# Altium PCB NB3000XN.PcbDoc (part 32 of 71)
Units mil, origin at the board's own origin, x right, y up, seen from the top; angles counter-clockwise.
Board outline 9527.56 x 6929.77 mil, 6 copper layers (Top Layer, GND+SHIELD, MidLayer1, MidLayer2, P2 - 3V3+5V0, Bottom Layer), stack 62.375 mil thick; 832 components, 1027 nets, 4655 pads, 4981 vias.
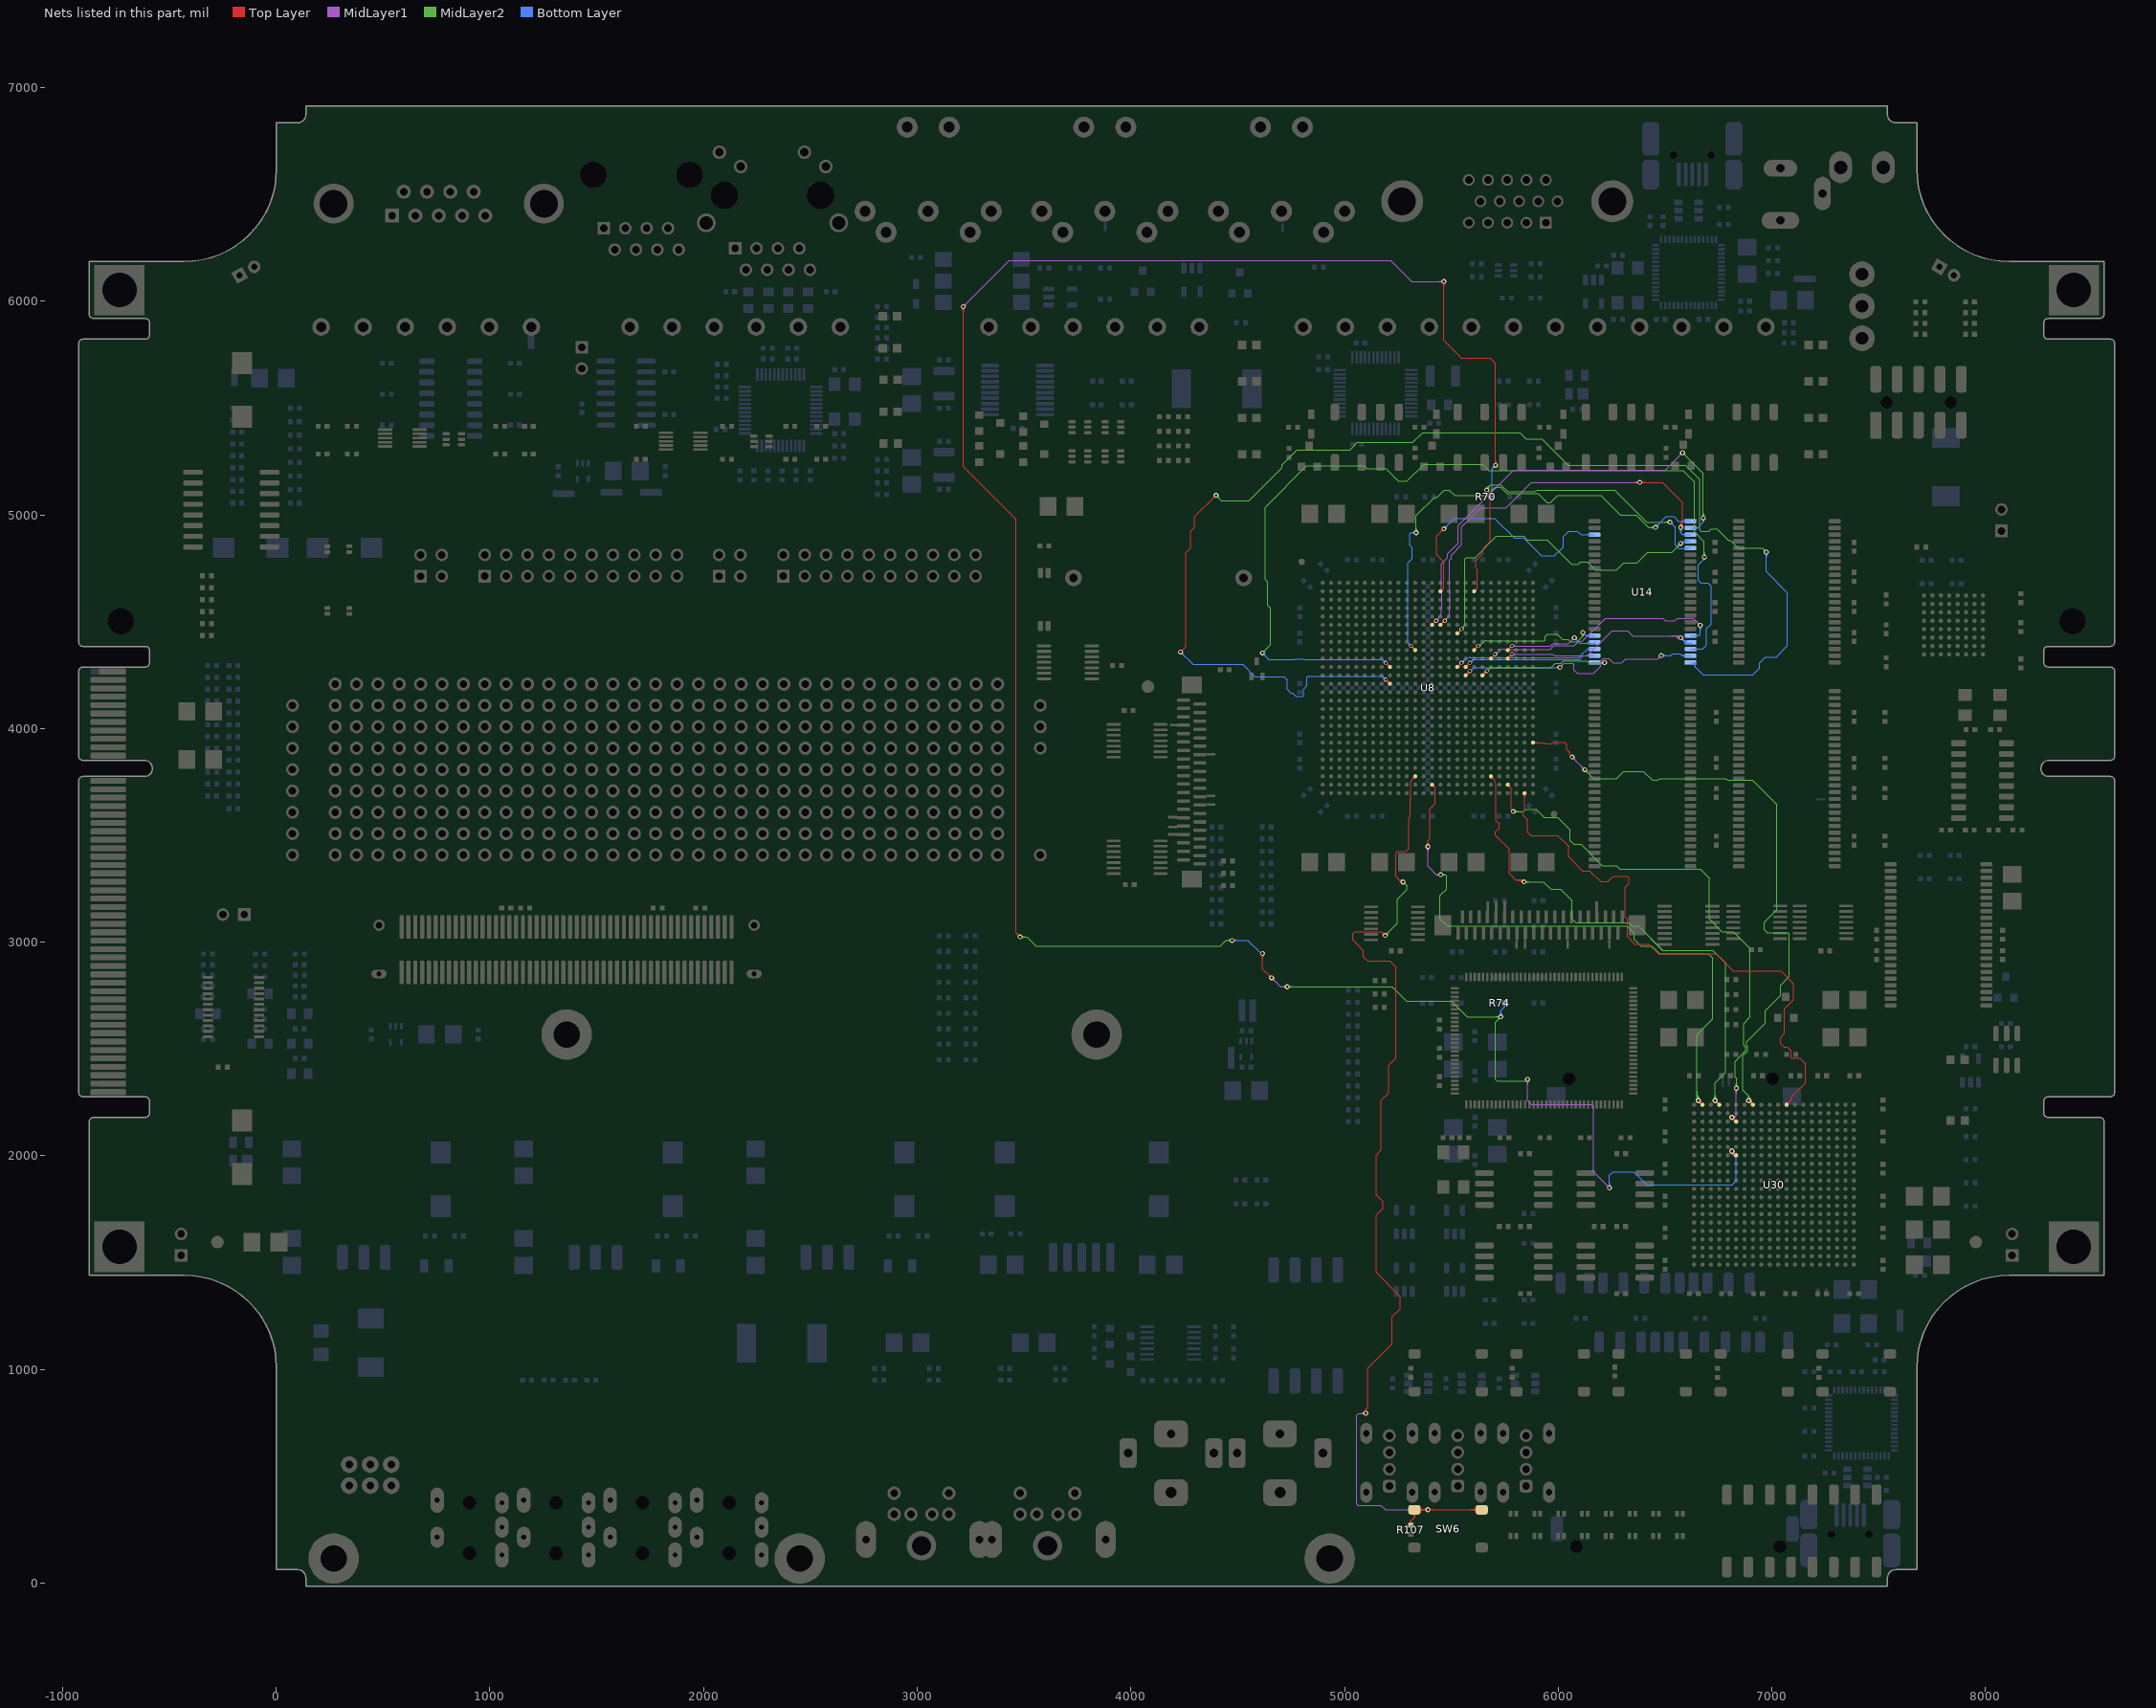
[diagram p36: the nets of this part, all layers, seen from the top]

## Via types
v1: diameter 23, hole 11.81, Top Layer to Bottom Layer, 3672 vias
v2: diameter 26, hole 11.81, Top Layer to Bottom Layer, 461 vias
v3: diameter 19, hole 11.81, Top Layer to Bottom Layer, tented both sides, 396 vias
v4: diameter 23.62, hole 11.81, Top Layer to Bottom Layer, 288 vias
v5: diameter 20, hole 11.81, Top Layer to Bottom Layer, 91 vias
v6: diameter 23, hole 11.81, Top Layer to Bottom Layer, tented both sides, 50 vias
v7: diameter 31, hole 11.81, Top Layer to Bottom Layer, 15 vias
v8: diameter 27.56, hole 11.81, Top Layer to Bottom Layer, tented both sides, 4 vias
v9: diameter 29, hole 11.81, Top Layer to Bottom Layer, 3 vias
v10: diameter 21, hole 11.81, Top Layer to Bottom Layer, 1 vias

## Nets (pads, with @x,y where several pads share a name; then routed paths per layer and width w, separated by ;. In a path a pad name is that pad's centre, name@x,y a point inside that pad or via, vN(x,y) a via of type N, cw(c..) or ccw(c..) an arc to the next point about the centre after c; other vN are vias at no path point) (continued)
DB_PROGRAM.PROGRAM: R70.1 R74.1 U30.R7 | length 12775.2
  Top Layer w4: v1@3208.47,5968.32 cw(c3192.26,5952.11) 3215.19,5952.11 cw(c3238.13,5952.11) v1@3221.91,5968.32 ; v1@3211.3,5971.15 cw(c3201.91,5961.76) 3215.19,5961.76 cw(c3228.47,5961.76) v1@3219.08,5971.15 ; v1(3215.19,5975.04) 3215.19,5224.81 3461.52,4978.48 3461.52,3045.37 v1(3481.86,3025.04) ; v1@3472.36,3025.04 ccw(c3449.42,3025.04) 3465.64,3041.26 ccw(c3481.86,3057.48) v1@3481.86,3034.54 ; v1@3476.36,3025.04 ccw(c3463.08,3025.04) 3472.47,3034.43 ccw(c3481.86,3043.82) v1@3481.86,3030.54 ; v1@4609.81,2940.66 cw(c4593.59,2924.44) 4616.52,2924.44 cw(c4639.46,2924.44) v1@4623.24,2940.66 ; v1@4612.64,2943.49 cw(c4603.25,2934.1) 4616.52,2934.1 cw(c4629.8,2934.1) v1@4620.41,2943.49 ; v1@4615.19,2947.37 v1(4616.52,2947.37) 4616.52,2875.37 v1(4658.52,2833.37) ; v1@4649.02,2833.37 ccw(c4626.09,2833.37) 4642.31,2849.59 ccw(c4658.52,2865.81) v1@4658.52,2842.87 ; v1@4653.02,2833.37 ccw(c4639.75,2833.37) 4649.14,2842.76 ccw(c4658.52,2852.15) v1@4658.52,2838.87 ; v1@5458.47,6085.99 cw(c5442.26,6069.77) 5465.19,6069.77 cw(c5488.13,6069.77) v1@5471.91,6085.99 ; v1@5461.3,6088.82 cw(c5451.91,6079.43) 5465.19,6079.43 cw(c5478.47,6079.43) v1@5469.08,6088.82 ; v1(5465.19,6092.71) 5465.19,5816.71 5548.52,5733.37 5681.86,5733.37 5706.86,5708.37 v1(5706.86,5232.04) ; v1@5700.14,5238.76 ccw(c5683.92,5254.98) 5706.86,5254.98 ccw(c5729.79,5254.98) v1@5713.57,5238.76 ; v1@5702.97,5235.93 ccw(c5693.58,5245.32) 5706.86,5245.32 ccw(c5720.14,5245.32) v1@5710.75,5235.93
  Top Layer w8: v2@6813.15,2013.48 cw(c6813.15,1991.75) 6828.51,2007.12 cw(c6843.88,2022.48) v2@6822.15,2022.48 ; v2(6813.15,2022.48) U30.R7@6832.83,2002.8 ; U30.R7@6826.99,2002.8 ccw(c6812.89,2002.8) 6822.86,2012.77 ccw(c6832.83,2022.74) U30.R7@6832.83,2008.64
  MidLayer1 w4: v1(3215.19,5975.04) 3431.86,6191.71 5215.19,6191.71 5315.19,6091.71 5465.19,6091.71 v1(5465.19,6092.71) ; v1@3215.19,5980.54 ccw(c3215.19,5993.82) 3224.58,5984.43 ccw(c3233.97,5975.04) v1@3220.69,5975.04 ; v1@3215.19,5984.54 ccw(c3215.19,6007.48) 3231.41,5991.26 ccw(c3247.63,5975.04) v1@3224.69,5975.04 ; v1@4658.52,2823.87 cw(c4658.52,2800.94) 4674.74,2817.16 cw(c4690.96,2833.37) v1@4668.02,2833.37 ; v1@4658.52,2827.87 cw(c4658.52,2814.6) 4667.91,2823.99 cw(c4677.3,2833.37) v1@4664.02,2833.37 ; v1(4658.52,2833.37) 4700.19,2791.71 v1(4731.86,2791.71) ; v1@4725.14,2784.99 ccw(c4708.92,2768.77) 4708.92,2791.71 ccw(c4708.92,2814.64) v1@4725.14,2798.43 ; v1@4727.97,2787.82 ccw(c4718.58,2778.43) 4718.58,2791.71 ccw(c4718.58,2804.99) v1@4727.97,2795.6 ; 5439.84,6091.71 ccw(c5439.84,6118.06) v1@5458.47,6099.43 ; 5444.67,6091.71 cw(c5444.67,6072.19) v1@5458.47,6085.99 ; 5449.5,6091.71 ccw(c5449.5,6108.4) v1@5461.3,6096.6 ; v1@5850.14,2351.66 cw(c5833.92,2335.44) 5856.86,2335.44 cw(c5879.79,2335.44) v1@5863.57,2351.66 ; v1@5852.97,2354.49 cw(c5843.58,2345.1) 5856.86,2345.1 cw(c5870.14,2345.1) v1@5860.75,2354.49 ; v1(5856.86,2358.37) 5856.86,2258.37 5873.52,2241.71 6156.86,2241.71 6165.19,2233.37 6165.19,1925.04 v1(6240.19,1850.04) ; v1@6230.69,1850.04 ccw(c6207.76,1850.04) 6223.97,1866.26 ccw(c6240.19,1882.48) v1@6240.19,1859.54 ; v1@6234.69,1850.04 ccw(c6221.41,1850.04) 6230.8,1859.43 ccw(c6240.19,1868.82) v1@6240.19,1855.54
  MidLayer2 w4: v1(3481.86,3025.04) 3515,3025.04 3557.33,2982.71 4419.33,2982.71 4445,3008.37 v1(4473.52,3008.37) ; v1@3485.75,3021.15 cw(c3495.14,3011.76) 3495.14,3025.04 cw(c3495.14,3038.32) v1@3485.75,3028.93 ; v1@3488.57,3018.32 cw(c3504.79,3002.11) 3504.79,3025.04 cw(c3504.79,3047.98) v1@3488.57,3031.76 ; v1@4466.81,3001.66 ccw(c4450.59,2985.44) 4450.59,3008.37 ccw(c4450.59,3031.31) v1@4466.81,3015.09 ; v1@4469.64,3004.49 ccw(c4460.25,2995.1) 4460.25,3008.37 ccw(c4460.25,3021.65) v1@4469.64,3012.26 ; v1(4731.86,2791.71) 5223.52,2791.71 5290.52,2724.71 5500.29,2724.71 5575.29,2649.71 5683.67,2649.71 5685,2651.04 v1(5731.86,2651.04) 5706.86,2626.04 5706.86,2358.14 5715,2350 5848.48,2350 v1(5856.86,2358.37) ; v1@4735.75,2787.82 cw(c4745.14,2778.43) 4745.14,2791.71 cw(c4745.14,2804.99) v1@4735.75,2795.6 ; v1@4738.57,2784.99 cw(c4754.79,2768.77) 4754.79,2791.71 cw(c4754.79,2814.64) v1@4738.57,2798.43 ; v1@5722.36,2651.04 cw(c5699.42,2651.04) 5715.64,2634.82 cw(c5731.86,2618.61) v1@5731.86,2641.54 ; v1@5725.14,2644.32 ccw(c5708.92,2628.11) 5708.92,2651.04 ccw(c5708.92,2673.98) v1@5725.14,2657.76 ; v1@5726.36,2651.04 cw(c5713.08,2651.04) 5722.47,2641.65 cw(c5731.86,2632.26) v1@5731.86,2645.54 ; v1@5727.97,2647.15 ccw(c5718.58,2637.76) 5718.58,2651.04 ccw(c5718.58,2664.32) v1@5727.97,2654.93
  Bottom Layer w4: v1(4473.52,3008.37) 4547.19,3008.37 4608.19,2947.37 v1(4616.52,2947.37) ; v1@4477.41,3004.49 cw(c4486.8,2995.1) 4486.8,3008.37 cw(c4486.8,3021.65) v1@4477.41,3012.26 ; v1@4480.24,3001.66 cw(c4496.46,2985.44) 4496.46,3008.37 cw(c4496.46,3031.31) v1@4480.24,3015.09 ; R70.1@5677.09,5092.08 ccw(c5645.47,5123.7) 5690.19,5123.7 ; R70.1@5679.92,5089.25 ccw(c5655.13,5114.05) 5690.19,5114.05 ; R70.1@5682.75,5086.42 ccw(c5664.78,5104.39) 5690.19,5104.39 ; R70.1@5683.68,5085 5683.68,5083.37 5690.19,5083.37 5690.19,5085 5690.19,5215.37 v1(5706.86,5232.04) ; v1@5697.36,5232.04 cw(c5674.42,5232.04) 5690.64,5215.82 cw(c5706.86,5199.61) v1@5706.86,5222.54 ; v1@5701.36,5232.04 cw(c5688.08,5232.04) 5697.47,5222.65 cw(c5706.86,5213.26) v1@5706.86,5226.54 ; v1@5725.14,2657.76 ccw(c5708.92,2673.98) 5731.86,2673.98 ccw(c5754.79,2673.98) v1@5738.57,2657.76 ; v1@5727.97,2654.93 ccw(c5718.58,2664.32) 5731.86,2664.32 ccw(c5745.14,2664.32) v1@5735.75,2654.93 ; v1(5731.86,2651.04) 5731.86,2680.05 5748.18,2696.37 ; R74.1@5742.76,2706.93 cw(c5735.2,2696.38) 5748.18,2696.38 ; R74.1@5748.18,2715 5748.18,2696.37 ; R74.1@5753.61,2706.93 ccw(c5761.16,2696.38) 5748.18,2696.38 ; v1@6233.47,1856.76 ccw(c6217.26,1872.98) 6240.19,1872.98 ccw(c6263.13,1872.98) v1@6246.91,1856.76 ; v1@6236.3,1853.93 ccw(c6226.91,1863.32) 6240.19,1863.32 ccw(c6253.47,1863.32) v1@6244.08,1853.93 ; v1(6240.19,1850.04) 6240.19,1908.37 6256.86,1925.04 6353.86,1925.04 6415.19,1863.71 6815.19,1863.71 6832.86,1881.37 6832.86,1990.71 6815.19,2008.37 6815.19,2022.48 v2(6813.15,2022.48) ; v2@6812.24,2022.9 ccw(c6823.51,2017.64) 6814.72,2008.85 ; v2@6815.87,2021.21 ccw(c6829.01,2015.07) 6818.75,2004.81 ; v2@6819.49,2019.52 ccw(c6834.51,2012.5) 6822.79,2000.78 ; v2@6823.12,2017.82 ccw(c6840.01,2009.93) 6826.82,1996.74
DB_RESET: R107.2 SW6.1 SW6.2 U8.AD12 | length 5826.8
  Top Layer w4: v4@5094.05,802.8 ccw(c5084.9,814.81) 5100,814.81 ; v4(5100,795) 5100,814.81 ; v4@5105.95,802.8 cw(c5115.1,814.81) 5100,814.81 ; v1@5180.69,3031.71 ccw(c5157.76,3031.71) 5173.97,3047.93 ccw(c5190.19,3064.14) v1@5190.19,3041.21 ; v1@5184.69,3031.71 ccw(c5171.41,3031.71) 5180.8,3041.1 ccw(c5190.19,3050.49) v1@5190.19,3037.21 ; v1(5190.19,3031.71) 5171.86,3050.04 5050.04,3050.04 5040,3040 5040,3010 5089.52,2960.48 5089.52,2930 5107.52,2912 5211.69,2912 5240.19,2883.5 5240.19,2458.37 5206.86,2425.04 5206.86,2295 5172,2260.14 5172,2027 5147.86,2002.86 5147.86,1818.46 5180,1786.31 5180,1755 5147.86,1722.86 5147.86,1453.46 5260,1341.31 5260,1283.54 5222.69,1246.23 5222.69,1120.62 5107.81,1005.74 5107.81,822.62 5100,814.81 ; 5244.36,3302.54 ccw(c5271.79,3329.97) v1@5273.18,3291.2 ; 5250.85,3296.04 ccw(c5272.24,3317.43) v1@5273.33,3287.2 ; 5257.35,3289.55 ccw(c5272.69,3304.89) v1@5273.47,3283.21 ; v1(5273.52,3281.71) 5265.19,3281.71 5240.19,3306.71 5240.19,3416.71 5248.52,3425.04 5287.19,3425.04 5301.19,3439.04 5301.19,3557 5301.19,3582.31 5307.08,3588.21 5307.08,3651.25 ; R107.2@5303.87,278.2 ccw(c5292.05,291.71) 5310,291.71 ; R107.2@5306.5,275.19 ccw(c5299.76,282.9) 5310,282.9 ccw(c5320.24,282.9) R107.2@5313.5,275.19 ; R107.2@5310,271.18 5310,291.71 ; R107.2@5316.13,278.2 cw(c5327.95,291.71) 5310,291.71 ; SW6.1@5317.21,325.64 cw(c5307.93,308.84) 5327.13,308.84 ; SW6.1@5319.15,329.14 cw(c5311.67,315.61) 5327.13,315.61 cw(c5342.58,315.62) SW6.1@5335.11,329.14 ; U8.AD12@5323.6,3776.61 cw(c5305.88,3776.61) 5318.41,3764.08 ; U8.AD12@5330.94,3769.27 ccw(c5330.94,3751.55) 5318.41,3764.08 ; SW6.1@5337.04,325.64 ccw(c5346.33,308.84) 5327.13,308.84 ; SW6.1@5341.96,334.74 cw(c5363.3,313.4) 5363.3,343.58 cw(c5363.3,373.76) SW6.1@5341.96,352.42 ; SW6.1@5344.79,331.92 cw(c5372.96,303.75) 5372.96,343.58 cw(c5372.96,383.42) SW6.1@5344.79,355.25 ; SW6.1@5347.62,329.09 cw(c5382.62,294.09) 5382.62,343.58 cw(c5382.62,393.07) SW6.1@5347.62,358.08 ; v4@5383.06,336.65 ccw(c5366.31,319.9) 5366.31,343.58 ccw(c5366.31,367.27) v4@5383.06,350.52 ; v4@5385.89,339.47 ccw(c5375.97,329.55) 5375.97,343.58 ccw(c5375.97,357.61) v4@5385.89,347.69 ; v4@5394.11,339.47 cw(c5404.03,329.55) 5404.03,343.58 cw(c5404.03,357.61) v4@5394.11,347.69 ; v4@5396.94,336.65 cw(c5413.69,319.9) 5413.69,343.58 cw(c5413.69,367.27) v4@5396.94,350.52 ; SW6.2@5621.98,329.09 ccw(c5586.99,294.09) 5586.99,343.58 ccw(c5586.99,393.07) SW6.2@5621.98,358.08 ; SW6.2@5624.81,331.92 ccw(c5596.65,303.75) 5596.65,343.58 ccw(c5596.65,383.42) SW6.2@5624.81,355.25 ; SW6.2@5627.64,334.74 ccw(c5606.3,313.4) 5606.3,343.58 ccw(c5606.3,373.76) SW6.2@5627.64,352.42 ; SW6.2@5642.48,343.58 v4(5390,343.58) SW6.1@5327.13,343.58 5327.13,308.83 ; 5307.08,3651.25 5307.08,3657 ; 5307.08,3651.25 5307.08,3655.26 5307.08,3657 ; 5307.08,3657 5307.08,3660 5307.08,3670 5307.08,3736.73 cw(c5345.76,3736.73) 5318.41,3764.08 ; 5310,291.71 5327.13,308.83
  MidLayer1 w4: v4@5093.06,788.06 ccw(c5076.31,771.31) 5076.31,795 ccw(c5076.31,818.69) v4@5093.06,801.94 ; v4@5095.89,790.89 ccw(c5085.97,780.97) 5085.97,795 ccw(c5085.97,809.03) v4@5095.89,799.11 ; v4(5100,795) 5065,795 5056.19,786.19 5056.19,370.12 5061.31,365 5170,365 5191.42,343.58 v4(5390,343.58) ; v4@5383.06,336.65 ccw(c5366.31,319.9) 5366.31,343.58 ccw(c5366.31,367.27) v4@5383.06,350.52 ; v4@5385.89,339.47 ccw(c5375.97,329.55) 5375.97,343.58 ccw(c5375.97,357.61) v4@5385.89,347.69
  MidLayer2 w4: v1(5190.19,3031.71) 5248.52,3090.04 5248.52,3202.1 5292.05,3245.62 5292.05,3263.18 v1(5273.52,3281.71) ; v1@5190.19,3037.21 ccw(c5190.19,3050.49) 5199.58,3041.1 ccw(c5208.97,3031.71) v1@5195.69,3031.71 ; v1@5190.19,3041.21 ccw(c5190.19,3064.14) 5206.41,3047.93 ccw(c5222.63,3031.71) v1@5199.69,3031.71 ; v1@5273.52,3272.21 cw(c5273.52,3249.27) 5289.74,3265.49 cw(c5305.96,3281.71) v1@5283.02,3281.71 ; v1@5273.52,3276.21 cw(c5273.52,3262.93) 5282.91,3272.32 cw(c5292.3,3281.71) v1@5279.02,3281.71
DB_SPI.CLK: U8.AE14 U30.W1 | length 3224.2
  Top Layer w4: v1@5383.47,3454.43 ccw(c5363.6,3474.3) 5391.7,3474.3 ; v1@5386.3,3451.6 ccw(c5373.26,3464.64) 5391.7,3464.64 ; v1(5390.19,3447.71) 5391.7,3449.22 5391.7,3475.86 5399.7,3483.86 5399.7,3624.49 5425.19,3649.98 5425.19,3660 5425.19,3670 5425.19,3717.53 ccw(c5415.04,3717.53) 5422.22,3724.71 ; 5391.7,3466.99 ccw(c5409.47,3466.99) v1@5396.91,3454.43 ; U8.AE14@5409.69,3729.9 cw(c5409.69,3712.17) 5422.22,3724.71 ; U8.AE14@5417.03,3737.24 ccw(c5434.75,3737.24) 5422.22,3724.71
  Top Layer w8: v2@6655.67,2249.7 cw(c6655.67,2227.97) 6671.03,2243.34 cw(c6686.4,2258.7) v2@6664.67,2258.7 ; v2(6655.67,2258.7) U30.W1@6675.35,2239.02 ; U30.W1@6669.51,2239.02 ccw(c6655.41,2239.02) 6665.38,2248.99 ccw(c6675.35,2258.96) U30.W1@6675.35,2244.86
  MidLayer1 w4: v1@5383.47,3440.99 cw(c5367.26,3424.77) 5390.19,3424.77 cw(c5413.13,3424.77) v1@5396.91,3440.99 ; v1@5386.3,3443.82 cw(c5376.91,3434.43) 5390.19,3434.43 cw(c5403.47,3434.43) v1@5394.08,3443.82 ; v1(5390.19,3447.71) 5390.19,3355.06 5429.21,3316.04 ; 5437.8,3316.04 ccw(c5437.8,3326.38) v1@5445.72,3319.73 ; 5438.08,3316.04 cw(c5438.08,3305.74) v1@5445.8,3312.55 ; v1@5442.65,3322.3 cw(c5429.21,3333.6) 5429.21,3316.04 ; v1@5442.8,3309.91 ccw(c5429.21,3297.91) 5429.21,3316.04 ; v1(5449.93,3316.19) 5456.04,3316.19 5456.19,3316.04 5429.21,3316.04
  MidLayer2 w4: v1(5449.93,3316.19) v1@5456.04,3316.19 ; v1@5454.05,3312.55 cw(c5462.12,3305.42) 5462.12,3316.19 cw(c5462.12,3326.97) v1@5454.05,3319.83 ; v1@5456.86,3316.71 v1@5456.34,3316.19 ; v1@5457.05,3309.9 cw(c5471,3297.58) 5471,3316.19 ; v1@5457.05,3322.48 ccw(c5471,3334.81) 5471,3316.19 ; 6322.21,3075.04 6355.96,3041.29 6355.96,3013.6 6386.86,2982.71 6438.94,2982.71 6475.27,2946.37 6702.19,2946.37 6723.52,2925.04 6723.52,2641.71 6648.52,2566.71 6648.52,2258.69 v2(6655.67,2258.7) ; 6323.52,3073.71 6322.19,3075.04 5481.86,3075.04 5447.86,3109.04 5447.86,3195 5447.86,3219.02 5477.19,3248.35 5477.19,3252.71 5477.19,3270 5477.19,3310 5471,3316.19 ; 6648.52,2273.54 ccw(c6670.51,2273.54) v2@6654.96,2257.99 ; 6648.52,2283.19 ccw(c6680.16,2283.19) v2@6657.79,2260.82 ; 6648.52,2292.85 ccw(c6689.82,2292.85) v2@6660.62,2263.65 ; 6648.52,2302.51 ccw(c6699.48,2302.51) v2@6663.45,2266.48 ; v1@5456.04,3316.19 5456.19,3316.04 v1@5456.34,3316.19 ; v1@5456.04,3316.19 v1@5456.34,3316.19 ; v1@5456.34,3316.19 5471,3316.19
DB_SPI.DIN: U8.Y26 U30.N1 | length 3334.4
  Top Layer w4: U8.Y26@5882.13,3934.09 5910,3934.09 5920,3934.09 5937.74,3934.09 5941.84,3930 5969.68,3930 5974.83,3935.15 6029.42,3935.15 6040.02,3924.54 6040.02,3902.83 6053.5,3889.36 6053.5,3878.4 v1(6065.19,3866.71) ; U8.Y26@5887.43,3928.79 cw(c5900.23,3915.99) 5900.23,3934.09 cw(c5900.23,3952.2) U8.Y26@5887.43,3939.4 ; 5899.85,3934.09 ccw(c5899.85,3916.37) 5887.32,3928.9 cw(c5899.85,3916.37) 5899.85,3934.09 ; 5899.85,3934.09 cw(c5899.85,3951.82) 5887.32,3939.29 ccw(c5899.85,3951.82) 5899.85,3934.09
  Top Layer w8: v2@6891.89,2249.7 cw(c6891.89,2227.97) 6907.25,2243.34 cw(c6922.62,2258.7) v2@6900.89,2258.7 ; v2(6891.89,2258.7) U30.N1@6911.57,2239.02 ; U30.N1@6905.73,2239.02 ccw(c6891.63,2239.02) 6901.6,2248.99 ccw(c6911.57,2258.96) U30.N1@6911.57,2244.86
  MidLayer1 w4: v1@6065.19,3857.21 cw(c6065.19,3834.27) 6081.41,3850.49 cw(c6097.63,3866.71) v1@6074.69,3866.71 ; v1@6065.19,3861.21 cw(c6065.19,3847.93) 6074.58,3857.32 cw(c6083.97,3866.71) v1@6070.69,3866.71 ; v1(6065.19,3866.71) v1(6124.52,3807.37) ; v1@6115.02,3807.37 ccw(c6092.09,3807.37) 6108.31,3823.59 ccw(c6124.52,3839.81) v1@6124.52,3816.87 ; v1@6119.02,3807.37 ccw(c6105.75,3807.37) 6115.14,3816.76 ccw(c6124.52,3826.15) v1@6124.52,3812.87
  MidLayer2 w4: v1@6124.52,3797.87 cw(c6124.52,3774.94) 6140.74,3791.16 cw(c6156.96,3807.37) v1@6134.02,3807.37 ; v1@6124.52,3801.87 cw(c6124.52,3788.6) 6133.91,3797.99 cw(c6143.3,3807.37) v1@6130.02,3807.37 ; v1(6124.52,3807.37) 6165.19,3766.71 6273.52,3766.71 6306.86,3800.04 6398.52,3800.04 6440.19,3758.37 6465.19,3758.37 6473.52,3766.71 6784.23,3766.71 6792.56,3758.37 6909.23,3758.37 7023.52,3644.08 7023.52,3610 7023.52,3151.04 6965.19,3092.71 6965.19,3058.37 6978.56,3045 7075.52,3045 7082.52,3038 7082.52,2840.31 7040.19,2797.98 7040.19,2750.19 6970,2680 6970,2621.52 6881.86,2533.37 6881.86,2515.44 6886.69,2510.6 6886.69,2489.48 6865.19,2467.98 6865.19,2404.81 ; 6865,2405 6865.19,2404.81 ; v2@6884.99,2267.27 ccw(c6873.4,2281.67) 6891.89,2281.67 ; v2@6887.5,2264.15 ccw(c6880.12,2273.32) 6891.89,2273.32 ccw(c6903.66,2273.32) v2@6896.28,2264.15 ; v2@6890.19,2258.7 v2(6891.89,2258.7) 6891.89,2281.68 ; v2@6898.79,2267.27 cw(c6910.38,2281.67) 6891.89,2281.67 ; 6865.19,2404.81 6865.19,2308.37 6891.89,2281.68
DB_SPI.DOUT: U8.AD21 U30.U1 | length 2953.7
  Top Layer w4: 5809.74,3291.71 cw(c5809.74,3258.53) v1@5835.86,3278.98 ; 5817.95,3291.71 cw(c5817.95,3264.96) v1@5839.01,3281.45 ; 5826.16,3291.71 cw(c5826.16,3271.39) v1@5842.16,3283.92 ; v1@5832.71,3276.52 ccw(c5801.53,3252.1) 5801.53,3291.71 ; v1(5840.19,3282.37) 5830.86,3291.71 5801.52,3291.71 ; 5697.81,3764.08 cw(c5670.46,3736.73) 5709.14,3736.73 ; 5697.81,3764.08 cw(c5670.46,3736.73) 5709.14,3736.73 ; 5697.81,3764.08 cw(c5710.34,3776.61) 5692.62,3776.61 ccw(c5710.34,3776.61) 5697.81,3764.08 ; 5697.81,3764.08 ccw(c5685.28,3751.55) 5685.28,3769.27 cw(c5685.28,3751.55) 5697.81,3764.08 ; 5709.14,3736.73 5709.14,3670 5709.14,3660 5709.14,3598 5709.14,3589.43 5709.14,3569.39 5723.52,3555 5723.52,3533.37 5707.19,3517.04 5707.19,3499.71 5771.19,3435.71 5771.19,3322.04 5801.52,3291.71
  Top Layer w8: v2@6734.41,2249.7 cw(c6734.41,2227.97) 6749.77,2243.34 cw(c6765.14,2258.7) v2@6743.41,2258.7 ; v2(6734.41,2258.7) U30.U1@6754.09,2239.02 ; U30.U1@6748.25,2239.02 ccw(c6734.15,2239.02) 6744.12,2248.99 ccw(c6754.09,2258.96) U30.U1@6754.09,2244.86
  MidLayer2 w4: v1(5840.19,3282.37) 5930.86,3282.37 5965.19,3248.04 6010.65,3248.04 6065.19,3193.5 6065.19,3108.37 6081.86,3091.71 6328.17,3091.71 6344.84,3075.04 6376.27,3075.04 ; v1@5844.08,3278.49 cw(c5853.47,3269.1) 5853.47,3282.37 cw(c5853.47,3295.65) v1@5844.08,3286.26 ; v1@5846.91,3275.66 cw(c5863.13,3259.44) 5863.13,3282.37 cw(c5863.13,3305.31) v1@5846.91,3289.09 ; v2@6726.63,2266.48 ccw(c6707.85,2285.26) 6734.41,2285.26 ccw(c6760.97,2285.26) v2@6742.19,2266.48 ; v2@6729.46,2263.65 ccw(c6717.51,2275.6) 6734.41,2275.6 ccw(c6751.31,2275.6) v2@6739.36,2263.65 ; v2@6740.19,2258.7 v2(6734.41,2258.7) 6734.41,2341.55 6782.86,2390 6782.86,2903.04 6723.52,2962.37 6489.78,2962.37 ; 6376.27,3075.04 6377.11,3075.04 6489.78,2962.37 ; 6376.27,3075.04 6488.94,2962.37 6489.78,2962.37
DB_SPI.MODE: U8.AF25 U30.J1 | length 2751.2
  Top Layer w4: U8.AF25@5837.45,3692.57 cw(c5824.65,3679.77) 5842.76,3679.77 cw(c5860.86,3679.77) U8.AF25@5848.06,3692.57 ; U8.AF25@5837.56,3692.68 cw(c5825.03,3680.15) 5842.76,3680.15 cw(c5860.48,3680.15) U8.AF25@5847.95,3692.68 ; U8.AF25@5842.76,3697.87 5842.76,3670 5842.76,3660 5842.76,3617.94 5837.19,3612.38 5837.19,3592.09 5857.02,3572.25 5857.02,3519.29 5857.02,3515.84 5872.82,3500.04 5998.52,3500.04 6048.52,3450.04 6048.52,3400.04 6115.19,3333.37 6148.52,3333.37 6198.52,3283.37 6231.86,3283.37 6256.86,3308.37 6323.52,3308.37 6331.86,3300.04 6331.86,3275.04 6313.19,3256.37 6313.19,3118.71 6323.52,3108.37 6323.52,3026.71 6358.52,2991.71 6423.29,2991.71 6470,2945 6740,2945 6820.3,2864.7 7043.2,2864.7 7102,2805.9 7102,2730.18 7060,2688.18 7060,2574.81 7040.19,2555 7040.19,2525.04 7056.86,2508.37 7073.52,2508.37 7090.19,2491.71 7090.19,2458.71 7091.86,2457.04 7131.86,2457.04 7156.86,2432.04 7156.86,2341.71 7090.19,2275.04 7090.19,2259.71 7088.86,2258.37
  Top Layer w8: U30.J1@7069.06,2239.02 7088.74,2258.7 ; U30.J1@7069.06,2244.86 ccw(c7069.06,2258.96) 7079.03,2248.99 ccw(c7089,2239.02) U30.J1@7074.9,2239.02
DB_SPI.SEL: U8.AE23 U30.R3 | length 2854.8
  Top Layer w4: v1@5790.19,3616.71 v1(5790.19,3611.71) 5779.52,3622.37 5779.52,3660 5779.52,3670 5779.52,3717.53 ; 5776.55,3724.71 cw(c5769.37,3717.53) 5779.52,3717.53 ; 5776.55,3724.71 cw(c5769.37,3717.53) 5779.52,3717.53 ; 5776.55,3724.71 ccw(c5764.02,3712.17) 5764.02,3729.9 cw(c5764.02,3712.17) 5776.55,3724.71 ; 5776.55,3724.71 cw(c5789.08,3737.24) 5771.36,3737.24 ccw(c5789.08,3737.24) 5776.55,3724.71
  Top Layer w8: v2@6813.15,2170.96 cw(c6813.15,2149.23) 6828.51,2164.6 cw(c6843.88,2179.96) v2@6822.15,2179.96 ; v2(6813.15,2179.96) U30.R3@6832.83,2160.28 ; U30.R3@6826.99,2160.28 ccw(c6812.89,2160.28) 6822.86,2170.25 ccw(c6832.83,2180.22) U30.R3@6832.83,2166.12
  MidLayer1 w4: v2(6813.15,2179.96) 6813.15,2183.37 6830.86,2183.37 ; v2@6820,2178.54 cw(c6825.94,2177.31) 6825.94,2183.37 ; v2@6821.11,2187.55 ccw(c6830.86,2196.83) 6830.86,2183.37 ; v2@6823.92,2177.73 cw(c6830.86,2176.29) 6830.86,2183.37 ; v1@6827.47,2309.99 cw(c6815.28,2297.79) 6832.52,2297.79 ; 6832.52,2289.75 cw(c6861.15,2289.75) v1@6840.91,2309.99 ; 6832.52,2299.41 cw(c6851.49,2299.41) v1@6838.08,2312.82 ; v1(6834.19,2316.71) 6832.52,2315.04 6832.52,2185.04 6830.86,2183.37
  MidLayer2 w4: v1(5790.19,3611.71) 5836.52,3611.71 5847.62,3622.81 5895.75,3622.81 5935.19,3583.37 5998.52,3583.37 6056.86,3525.04 6056.86,3475.04 6073.52,3458.37 6106.86,3458.37 6206.86,3358.37 6273.52,3358.37 6289.86,3342.04 6665.19,3342.04 6706.86,3300.37 6706.86,3108.37 6765.19,3050.04 6819.86,3050.04 6898.52,2971.37 6898.52,2650.04 6868.44,2619.96 6868.44,2517.54 6878.69,2507.29 6878.69,2492.79 ; v1@5794.08,3607.82 cw(c5803.47,3598.43) 5803.47,3611.71 cw(c5803.47,3624.99) v1@5794.08,3615.6 ; v1@5796.91,3604.99 cw(c5813.13,3588.77) 5813.13,3611.71 cw(c5813.13,3634.64) v1@5796.91,3618.43 ; v1@6827.47,2323.43 ccw(c6811.26,2339.64) 6834.19,2339.64 ccw(c6857.13,2339.64) v1@6840.91,2323.43 ; v1@6830.3,2320.6 ccw(c6820.91,2329.99) 6834.19,2329.99 ccw(c6847.47,2329.99) v1@6838.08,2320.6 ; v1(6834.19,2316.71) 6834.19,2361.06 6827.5,2367.75 6827.5,2441.6 6878.69,2492.79 ; 6868.44,2482.54 6878.69,2492.79
DB_SRAM1.A0: U8.J12 U14.1 | length 2559.5
  Top Layer w4: v3(5311.26,4386.85) U8.J12@5330.94,4367.17 ; U8.J12@5323.44,4367.17 ccw(c5305.34,4367.17) 5318.14,4379.97 ccw(c5330.94,4392.77) U8.J12@5330.94,4374.67 ; U8.J12@5323.6,4367.17 ccw(c5305.88,4367.17) 5318.41,4379.7 ccw(c5330.94,4392.23) U8.J12@5330.94,4374.51 ; 5324.06,4374.05 cw(c5336.87,4386.85) 5318.76,4386.85 ccw(c5336.87,4386.85) 5324.06,4374.05 ; 5324.06,4374.05 ccw(c5311.26,4361.24) 5311.26,4379.35 cw(c5311.26,4361.24) 5324.06,4374.05
  MidLayer2 w4: v1@5328.81,4923.43 ccw(c5312.59,4939.64) 5335.52,4939.64 ccw(c5358.46,4939.64) v1@5342.24,4923.43 ; v1@5331.64,4920.6 ccw(c5322.25,4929.99) 5335.52,4929.99 ccw(c5348.8,4929.99) v1@5339.41,4920.6 ; v1(5335.52,4916.71) 5335.52,4996.37 5422.52,5083.37 5432.52,5083.37 5465.86,5116.71 5490.19,5116.71 5515.19,5091.71 5665.86,5091.71 5703.52,5129.37 5731.52,5129.37 5760.86,5100.04 5906.52,5100.04 5948.19,5058.37 5964.86,5058.37 5998.19,5091.71 6198.52,5091.71 6290.19,5000.04 6363.86,5000.04 6422.19,4941.71 v1(6455.52,4941.71) ; v1@6448.81,4934.99 ccw(c6432.59,4918.77) 6432.59,4941.71 ccw(c6432.59,4964.64) v1@6448.81,4948.43 ; v1@6451.64,4937.82 ccw(c6442.25,4928.43) 6442.25,4941.71 ccw(c6442.25,4954.99) v1@6451.64,4945.6
  Bottom Layer w4: 5299.87,4400.43 cw(c5309.8,4410.36) 5295.75,4410.36 5295.75,4503.9 5295.75,4710 5295.75,4720 5295.75,4774.6 5317.19,4796.04 5317.19,4845.71 5305.52,4857.37 5305.52,4911.37 5310.86,4916.71 v1(5335.52,4916.71) ; v3@5303.79,4387.5 ccw(c5285.75,4389.08) 5299.62,4400.72 ccw(c5313.49,4412.36) v3@5311.91,4394.32 ; v1@5328.81,4909.99 ccw(c5312.59,4893.77) 5312.59,4916.71 ccw(c5312.59,4939.64) v1@5328.81,4923.43 ; v1@5331.64,4912.82 ccw(c5322.25,4903.43) 5322.25,4916.71 ccw(c5322.25,4929.99) v1@5331.64,4920.6 ; v1(6455.52,4941.71) 6505.68,4991.87 6541.36,4991.87 6562.52,4970.71 U14.1@6619.41,4970.71 ; v1@6455.52,4947.21 ccw(c6455.52,4960.49) 6464.91,4951.1 ccw(c6474.3,4941.71) v1@6461.02,4941.71 ; v1@6455.52,4951.21 ccw(c6455.52,4974.14) 6471.74,4957.93 ccw(c6487.96,4941.71) v1@6465.02,4941.71 ; U14.1@6596.19,4965.05 ccw(c6582.54,4951.39) 6582.54,4970.71 ccw(c6582.54,4990.02) U14.1@6596.19,4976.37
DB_SRAM1.A1: U8.F14 U14.2 | length 2521.7
  Top Layer w4: U8.F14@5409.69,4485.28 v3(5429.37,4504.96) ; U8.F14@5409.69,4492.62 ccw(c5409.69,4510.34) 5422.22,4497.81 ccw(c5434.75,4485.28) U8.F14@5417.03,4485.28 ; U8.F14@5409.69,4492.78 ccw(c5409.69,4510.88) 5422.49,4498.08 ccw(c5435.29,4485.28) U8.F14@5417.19,4485.28 ; 5416.57,4492.16 cw(c5429.37,4479.35) 5429.37,4497.46 ccw(c5429.37,4479.35) 5416.57,4492.16 ; 5416.57,4492.16 ccw(c5403.76,4504.96) 5421.87,4504.96 cw(c5403.76,4504.96) 5416.57,4492.16
  MidLayer1 w4: v3@5428.72,4512.43 ccw(c5427.14,4530.47) 5441.01,4518.83 ; v3@5436.84,4505.61 cw(c5454.88,4507.19) 5441.01,4518.83 ; 5453.23,4581.77 5453.23,4567.84 ; v1@6572.36,5291.71 cw(c6549.42,5291.71) 6565.64,5275.49 cw(c6581.86,5259.27) v1@6581.86,5282.21 ; v1@6576.36,5291.71 cw(c6563.08,5291.71) 6572.47,5282.32 cw(c6581.86,5272.93) v1@6581.86,5286.21 ; v1(6581.86,5291.71) 6500.86,5210.71 5792.52,5210.71 5531.86,4950.04 5531.86,4867.32 5482.5,4817.96 5482.5,4800.68 5453.23,4771.42 5453.23,4724.74 5453.23,4720 5453.23,4710 5453.23,4661.38 5453.23,4641.96 5453.23,4567.84 ; 5441.01,4518.83 ccw(c5411.5,4548.34) 5453.23,4548.34 5453.23,4567.84
  MidLayer2 w4: v1@6581.86,5282.21 cw(c6581.86,5259.27) 6598.07,5275.49 cw(c6614.29,5291.71) v1@6591.36,5291.71 ; v1@6581.86,5286.21 cw(c6581.86,5272.93) 6591.25,5282.32 cw(c6600.64,5291.71) v1@6587.36,5291.71 ; v1(6581.86,5291.71) 6679.52,5194.04 v1(6679.52,4985.71) ; v1@6672.81,4992.43 ccw(c6656.59,5008.64) 6679.52,5008.64 ccw(c6702.46,5008.64) v1@6686.24,4992.43 ; v1@6675.64,4989.6 ccw(c6666.25,4998.99) 6679.52,4998.99 ccw(c6692.8,4998.99) v1@6683.41,4989.6
  Bottom Layer w4: U14.2@6619.41,4939.21 6653.52,4939.21 ; U14.2@6643.24,4934.24 cw(c6653.52,4926.08) 6653.52,4939.21 ; U14.2@6643.24,4944.18 ccw(c6653.52,4952.34) 6653.52,4939.21 ; v1@6673.38,4978.46 cw(c6662.17,4965.21) 6679.52,4965.21 ; v1@6675.97,4981.51 cw(c6669.48,4973.84) 6679.52,4973.84 cw(c6689.57,4973.84) v1@6683.08,4981.51 ; v1(6679.52,4985.71) 6679.52,4965.21 ; v1@6685.66,4978.46 ccw(c6696.88,4965.21) 6679.52,4965.21 ; 6653.52,4939.21 6679.52,4965.21
DB_SRAM1.A2: U8.F15 U14.3 | length 2305.8
  Top Layer w4: U8.F15@5449.06,4485.28 v3(5468.74,4504.96) ; U8.F15@5449.06,4492.62 ccw(c5449.06,4510.34) 5461.59,4497.81 ccw(c5474.12,4485.28) U8.F15@5456.4,4485.28 ; U8.F15@5449.06,4492.78 ccw(c5449.06,4510.88) 5461.86,4498.08 ccw(c5474.66,4485.28) U8.F15@5456.56,4485.28 ; v1(6381.86,5152.37) 6487.86,5152.37 6581.86,5058.37 6581.86,4950.04 v1(6573.52,4941.71) ; v1@6385.75,5148.49 cw(c6395.14,5139.1) 6395.14,5152.37 cw(c6395.14,5165.65) v1@6385.75,5156.26 ; v1@6388.57,5145.66 cw(c6404.79,5129.44) 6404.79,5152.37 cw(c6404.79,5175.31) v1@6388.57,5159.09 ; v1@6566.81,4948.43 ccw(c6530.47,4984.76) 6581.86,4984.76 ; v1@6569.64,4945.6 ccw(c6540.13,4975.1) 6581.86,4975.1 ; v1@6572.46,4942.77 ccw(c6549.79,4965.45) 6581.86,4965.45 ; v1@6575.29,4939.94 ccw(c6559.44,4955.79) 6581.86,4955.79 ; 5455.94,4492.16 cw(c5468.74,4479.35) 5468.74,4497.46 ccw(c5468.74,4479.35) 5455.94,4492.16 ; 5455.94,4492.16 ccw(c5443.13,4504.96) 5461.24,4504.96 cw(c5443.13,4504.96) 5455.94,4492.16
  MidLayer1 w4: v3@5468.09,4512.43 ccw(c5466.51,4530.47) 5480.38,4518.83 ; v3@5476.21,4505.61 cw(c5494.25,4507.19) 5480.38,4518.83 ; 5492.6,4581.77 5492.6,4567.84 ; v1@6375.14,5145.66 ccw(c6358.92,5129.44) 6358.92,5152.37 ccw(c6358.92,5175.31) v1@6375.14,5159.09 ; v1@6377.97,5148.49 ccw(c6368.58,5139.1) 6368.58,5152.37 ccw(c6368.58,5165.65) v1@6377.97,5156.26 ; v1(6381.86,5152.37) 5874.82,5152.37 5755.82,5033.37 5637.82,5033.37 5613.32,5008.88 5548.52,4944.08 5548.52,4861.35 5499.52,4812.35 5499.52,4795.08 5492.6,4788.16 5492.6,4724.74 5492.6,4720 5492.6,4710 5492.6,4661.38 5492.6,4641.96 5492.6,4567.84 ; 5480.38,4518.83 ccw(c5450.87,4548.34) 5492.6,4548.34 5492.6,4567.84
  Bottom Layer w4: v1@6566.81,4934.99 cw(c6550.59,4918.77) 6573.52,4918.77 cw(c6596.46,4918.77) v1@6580.24,4934.99 ; v1@6569.64,4937.82 cw(c6560.25,4928.43) 6573.52,4928.43 cw(c6586.8,4928.43) v1@6577.41,4937.82 ; v1(6573.52,4941.71) 6573.52,4915.72 6581.52,4907.72 U14.3@6619.41,4907.72 ; U14.3@6596.19,4902.06 ccw(c6582.54,4888.4) 6582.54,4907.72 ccw(c6582.54,4927.03) U14.3@6596.19,4913.37
DB_SRAM1.A3: U8.G17 U14.4 | length 1921.6
  Top Layer w4: U8.G17@5527.8,4445.91 v3(5547.48,4465.59) ; U8.G17@5527.8,4453.25 ccw(c5527.8,4470.97) 5540.33,4458.44 ccw(c5552.86,4445.91) U8.G17@5535.14,4445.91 ; U8.G17@5527.8,4453.41 ccw(c5527.8,4471.51) 5540.6,4458.71 ccw(c5553.4,4445.91) U8.G17@5535.3,4445.91 ; 5534.68,4452.79 cw(c5547.48,4439.98) 5547.48,4458.09 ccw(c5547.48,4439.98) 5534.68,4452.79 ; 5534.68,4452.79 ccw(c5521.87,4465.59) 5539.98,4465.59 cw(c5521.87,4465.59) 5534.68,4452.79
  MidLayer2 w4: v3@5546.83,4473.06 ccw(c5545.25,4491.1) 5559.12,4479.46 ccw(c5572.99,4467.82) v3@5554.95,4466.24 ; 5558.87,4479.17 ccw(c5548.94,4489.1) 5562.99,4489.1 ; 5562.99,4503.03 5562.99,4489.1 ; 5562.99,4699.16 5562.99,4640.9 ; v1@6564.02,4866.71 cw(c6541.09,4866.71) 6557.31,4850.49 cw(c6573.52,4834.27) v1@6573.52,4857.21 ; v1@6568.02,4866.71 cw(c6554.75,4866.71) 6564.14,4857.32 cw(c6573.52,4847.93) v1@6573.52,4861.21 ; v1(6573.52,4866.71) 6531.86,4825.04 6418.19,4825.04 6368.52,4775.37 6307.19,4775.37 6273.52,4741.71 6175.52,4741.71 6137.23,4780 6105,4780 6093.37,4768.37 6062.84,4768.37 5947.84,4883.37 5854.86,4883.37 5838.19,4900.04 5711.5,4900.04 5611.46,4800 5570,4800 5562.99,4792.99 5562.99,4724.74 5562.99,4720 5562.99,4710 5562.99,4640.9 ; 5562.99,4489.1 5562.99,4582.64 5562.99,4640.9
  Bottom Layer w4: v1(6573.52,4866.71) 6581.19,4866.71 6590.7,4876.22 ; v1@6576.41,4871.39 ccw(c6580.98,4878.79) 6587.12,4872.64 ; v1@6578.51,4874.79 ccw(c6583.7,4883.21) 6590.7,4876.22 ; v1@6580.82,4866.34 cw(c6596.41,4850.75) U14.4@6601.01,4872.31 ; 6586.02,4871.54 cw(c6598.24,4859.32) U14.4@6601.85,4876.22 ; 6591.22,4876.74 cw(c6600.07,4867.89) U14.4@6602.69,4880.13 ; U14.4@6619.41,4876.22 6590.7,4876.22
DB_SRAM1.A4: U8.B19 U14.5 | length 1958.6
  Top Layer w4: U8.B19@5606.54,4650.1 ccw(c5606.54,4667.83) 5619.07,4655.29 ; U8.B19@5613.88,4642.76 cw(c5631.6,4642.76) 5619.07,4655.29 ; 5622.04,4724.74 5622.04,4725.04 ; v1@5665.19,5107.21 cw(c5665.19,5084.27) 5681.41,5100.49 cw(c5697.63,5116.71) v1@5674.69,5116.71 ; v1@5665.19,5111.21 cw(c5665.19,5097.93) 5674.58,5107.32 cw(c5683.97,5116.71) v1@5670.69,5116.71 ; v1(5665.19,5116.71) 5681.69,5100.21 5681.69,4875.37 5648.52,4842.21 5648.52,4819.37 5613.86,4784.71 5613.86,4750.04 5622.04,4741.85 5622.04,4720 5622.04,4710 5622.04,4662.47 cw(c5611.89,4662.47) 5619.07,4655.29
  MidLayer2 w4: v1(5665.19,5116.71) 5665.19,5125.04 5681.86,5141.71 ; v1@5666.67,5116.97 cw(c5682.16,5119.75) 5671.03,5130.88 ; v1@5670.6,5117.68 cw(c5691.34,5121.4) 5676.44,5136.29 ; v1@5674.54,5118.39 cw(c5700.52,5123.05) 5681.86,5141.71 ; v1@6516.81,4959.99 ccw(c6500.59,4943.77) 6500.59,4966.71 ccw(c6500.59,4989.64) v1@6516.81,4973.43 ; v1@6519.64,4962.82 ccw(c6510.25,4953.43) 6510.25,4966.71 ccw(c6510.25,4979.99) v1@6519.64,4970.6 ; v1(6523.52,4966.71) 6415.19,4966.71 6265.19,5116.71 5898.52,5116.71 5890.19,5108.37 5763.86,5108.37 5730.52,5141.71 5681.86,5141.71
  Bottom Layer w4: v1@6523.52,4957.21 cw(c6523.52,4934.27) 6539.74,4950.49 cw(c6555.96,4966.71) v1@6533.02,4966.71 ; v1@6523.52,4961.21 cw(c6523.52,4947.93) 6532.91,4957.32 cw(c6542.3,4966.71) v1@6529.02,4966.71 ; v1(6523.52,4966.71) 6548.52,4941.71 6548.52,4928.37 6548.52,4920 6548.52,4858.37 6565.19,4841.71 6601.84,4841.71 6601.84,4844.72 U14.5@6619.41,4844.72 ; 6575.26,4841.71 ccw(c6575.26,4871.31) U14.5@6596.19,4850.38 ; 6584.91,4841.71 ccw(c6584.91,4861.66) U14.5@6599.02,4847.55 ; 6589.82,4841.71 cw(c6589.82,4832.69) U14.5@6596.19,4839.07
DB_SRAM1.A5: U8.K21 U14.18 | length 1451.8
  Top Layer w4: U8.K21@5685.28,4327.8 v3(5704.96,4347.48) ; U8.K21@5685.28,4335.14 ccw(c5685.28,4352.86) 5697.81,4340.33 ccw(c5710.34,4327.8) U8.K21@5692.62,4327.8 ; U8.K21@5685.28,4335.3 ccw(c5685.28,4353.4) 5698.08,4340.6 ccw(c5710.88,4327.8) U8.K21@5692.78,4327.8 ; 5692.16,4334.68 cw(c5704.96,4321.87) 5704.96,4339.98 ccw(c5704.96,4321.87) 5692.16,4334.68 ; 5692.16,4334.68 ccw(c5679.35,4347.48) 5697.46,4347.48 cw(c5679.35,4347.48) 5692.16,4334.68
  MidLayer1 w4: v3@5705.61,4354.95 ccw(c5707.19,4372.99) 5718.83,4359.12 ; v3@5712.43,4346.83 cw(c5730.47,4345.25) 5718.83,4359.12 ; 5781.77,4371.34 5767.84,4371.34 ; v1@6655.69,4483.37 ccw(c6632.76,4483.37) 6648.97,4499.59 ccw(c6665.19,4515.81) v1@6665.19,4492.87 ; v1@6659.69,4483.37 ccw(c6646.41,4483.37) 6655.8,4492.76 ccw(c6665.19,4502.15) v1@6665.19,4488.87 ; v1(6665.19,4483.37) 6631.86,4516.71 6556.71,4516.71 6545,4505 6501.71,4505 6490,4516.71 6220.54,4516.71 6111.88,4408.04 6095.21,4408.04 6075.88,4388.71 5978.79,4388.71 5961.43,4371.34 5920,4371.34 5910,4371.34 5861.38,4371.34 5841.96,4371.34 5767.84,4371.34 ; 5718.83,4359.12 cw(c5748.34,4329.61) 5748.34,4371.34 5767.84,4371.34
  Bottom Layer w4: U14.18@6619.41,4435.27 6660.27,4435.27 6665.19,4440.19 v1(6665.19,4483.37) ; U14.18@6642.63,4429.62 cw(c6656.28,4415.96) 6656.28,4435.27 cw(c6656.28,4454.59) U14.18@6642.63,4440.93 ; v1@6658.47,4476.66 cw(c6642.26,4460.44) 6665.19,4460.44 cw(c6688.13,4460.44) v1@6671.91,4476.66 ; v1@6661.3,4479.49 cw(c6651.91,4470.1) 6665.19,4470.1 cw(c6678.47,4470.1) v1@6669.08,4479.49
DB_SRAM1.A6: U8.K23 U14.19 | length 1381.3
  Top Layer w4: U8.K23@5764.02,4327.8 v3(5783.7,4347.48) ; U8.K23@5764.02,4335.14 ccw(c5764.02,4352.86) 5776.55,4340.33 ccw(c5789.08,4327.8) U8.K23@5771.36,4327.8 ; U8.K23@5764.02,4335.3 ccw(c5764.02,4353.4) 5776.82,4340.6 ccw(c5789.62,4327.8) U8.K23@5771.52,4327.8 ; 5770.9,4334.68 cw(c5783.7,4321.87) 5783.7,4339.98 ccw(c5783.7,4321.87) 5770.9,4334.68 ; 5770.9,4334.68 ccw(c5758.09,4347.48) 5776.2,4347.48 cw(c5758.09,4347.48) 5770.9,4334.68
  MidLayer1 w4: v3(5783.7,4347.48) 5861.38,4347.48 5910,4347.48 5920,4347.48 5976.13,4347.48 5981.9,4341.71 6137.21,4341.71 6253.88,4458.37 6323.52,4458.37 6348.52,4433.37 6565.19,4433.37 v1(6573.52,4425.04) ; v3@5788.89,4342.29 cw(c5801.43,4329.75) 5801.43,4347.48 cw(c5801.43,4365.21) v3@5788.89,4352.67 ; 6530.47,4433.37 cw(c6530.47,4381.99) v1@6566.81,4418.32 ; 6540.13,4433.37 cw(c6540.13,4391.64) v1@6569.64,4421.15 ; 6549.78,4433.37 cw(c6549.78,4401.3) v1@6572.46,4423.98 ; 6559.44,4433.37 cw(c6559.44,4410.96) v1@6575.29,4426.81 ; 5801.81,4347.48 cw(c5801.81,4365.59) 5789,4352.78 ccw(c5801.81,4365.59) 5801.81,4347.48 ; 5801.81,4347.48 ccw(c5801.81,4329.37) 5789,4342.18 cw(c5801.81,4329.37) 5801.81,4347.48
  Bottom Layer w4: v1@6573.52,4415.54 cw(c6573.52,4392.61) 6589.74,4408.82 cw(c6605.96,4425.04) v1@6583.02,4425.04 ; v1@6573.52,4419.54 cw(c6573.52,4406.26) 6582.91,4415.65 cw(c6592.3,4425.04) v1@6579.02,4425.04 ; v1(6573.52,4425.04) 6598.52,4400.04 6619.41,4400.04 6623.52,4400.04 6623.52,4403.78 U14.19@6619.41,4403.78 ; v1@6577.06,4421.51 ccw(c6600.59,4445.04) U14.19@6601.61,4411.77 ; 6583.6,4414.96 ccw(c6600.98,4432.34) U14.19@6601.73,4407.78 ; 6590.15,4408.42 ccw(c6601.37,4419.64) U14.19@6601.85,4403.78
DB_SRAM1.A7: U8.L9 U14.20 | length 4775.9
  Top Layer w4: v3(5193.15,4308.11) U8.L9@5212.83,4288.43 ; U8.L9@5205.33,4288.43 ccw(c5187.23,4288.43) 5200.03,4301.23 ccw(c5212.83,4314.03) U8.L9@5212.83,4295.93 ; U8.L9@5205.49,4288.43 ccw(c5187.77,4288.43) 5200.3,4300.96 ccw(c5212.83,4313.49) U8.L9@5212.83,4295.77 ; 5205.95,4295.31 ccw(c5193.15,4282.5) 5193.15,4300.61 cw(c5193.15,4282.5) 5205.95,4295.31 ; 5205.95,4295.31 cw(c5218.76,4308.11) 5200.65,4308.11 ccw(c5218.76,4308.11) 5205.95,4295.31
  MidLayer2 w4: v1(4615.19,4354.04) 4653.19,4392.04 4653.19,4563.71 4640.19,4576.71 4640.19,4685 ; v1@4615.19,4359.54 ccw(c4615.19,4372.82) 4624.58,4363.43 ccw(c4633.97,4354.04) v1@4620.69,4354.04 ; v1@4615.19,4363.54 ccw(c4615.19,4386.48) 4631.41,4370.26 ccw(c4647.63,4354.04) v1@4624.69,4354.04 ; 4640,4685 4628.52,4696.48 4628.52,5035 4822.71,5229.19 5092.33,5229.19 5104.98,5216.54 5193.73,5216.54 5252.4,5157.87 5292.87,5157.87 5372.37,5237.37 5646.19,5237.37 5675.19,5208.37 6584.71,5208.37 6638.02,5155.06 6638.02,4920.83 6683.86,4875 v1(6683.86,4802.04) ; v1@6677.14,4808.76 ccw(c6660.92,4824.98) 6683.86,4824.98 ccw(c6706.79,4824.98) v1@6690.57,4808.76 ; v1@6679.97,4805.93 ccw(c6670.58,4815.32) 6683.86,4815.32 ccw(c6697.14,4815.32) v1@6687.75,4805.93
  Bottom Layer w4: v1@4615.19,4344.54 cw(c4615.19,4321.61) 4631.41,4337.82 cw(c4647.63,4354.04) v1@4624.69,4354.04 ; v1@4615.19,4348.54 cw(c4615.19,4335.26) 4624.58,4344.65 cw(c4633.97,4354.04) v1@4620.69,4354.04 ; v1(4615.19,4354.04) 4645.19,4324.04 4765.19,4324.04 4767.52,4326.37 4811.06,4326.37 4813.82,4323.62 4860,4323.62 4870,4323.62 5076.1,4323.62 5169.64,4323.62 cw(c5169.64,4309.57) 5179.57,4319.5 ; v3@5185.68,4307.46 ccw(c5167.64,4305.88) 5179.28,4319.75 ccw(c5190.92,4333.62) v3@5192.5,4315.58 ; U14.20@6619.41,4372.28 6677.28,4372.28 6695,4390 6695,4468.18 6716.52,4489.71 6716.52,4666.71 6701.52,4681.71 6666.86,4681.71 6656.86,4691.71 6656.86,4766.71 6683.86,4793.71 v1(6683.86,4802.04) ; U14.20@6642.63,4366.63 cw(c6656.28,4352.97) 6656.28,4372.28 cw(c6656.28,4391.6) U14.20@6642.63,4377.94
DB_SRAM1.A8: U8.M18 U14.21 | length 1526.3
  Top Layer w4: U8.M18@5567.17,4249.06 v3(5586.85,4268.74) ; U8.M18@5567.17,4256.4 ccw(c5567.17,4274.12) 5579.7,4261.59 ccw(c5592.23,4249.06) U8.M18@5574.51,4249.06 ; U8.M18@5567.17,4256.56 ccw(c5567.17,4274.66) 5579.97,4261.86 ccw(c5592.77,4249.06) U8.M18@5574.67,4249.06 ; 5574.05,4255.94 cw(c5586.85,4243.13) 5586.85,4261.24 ccw(c5586.85,4243.13) 5574.05,4255.94 ; 5574.05,4255.94 ccw(c5561.24,4268.74) 5579.35,4268.74 cw(c5561.24,4268.74) 5574.05,4255.94
  MidLayer1 w4: v1(6008.19,4286.37) 6027.86,4306.04 6069.21,4306.04 6073.86,4301.39 6073.86,4275.37 6073.52,4275.04 6090.19,4258.37 6165.19,4258.37 6198.52,4291.71 6198.52,4316.71 6209.52,4327.71 6237.52,4327.71 6256.86,4308.37 6298.52,4308.37 6315.19,4325.04 6465.86,4325.04 v1(6482.52,4341.71) ; v1@6008.19,4291.87 ccw(c6008.19,4305.15) 6017.58,4295.76 ccw(c6026.97,4286.37) v1@6013.69,4286.37 ; v1@6008.19,4295.87 ccw(c6008.19,4318.81) 6024.41,4302.59 ccw(c6040.63,4286.37) v1@6017.69,4286.37 ; v1@6473.02,4341.71 cw(c6450.09,4341.71) 6466.31,4325.49 cw(c6482.52,4309.27) v1@6482.52,4332.21 ; v1@6477.02,4341.71 cw(c6463.75,4341.71) 6473.14,4332.32 cw(c6482.52,4322.93) v1@6482.52,4336.21
  Bottom Layer w4: v3@5587.5,4276.21 ccw(c5589.08,4294.25) 5600.72,4280.38 ccw(c5612.36,4266.51) v3@5594.32,4268.09 ; 5600.43,4280.13 cw(c5610.36,4270.2) 5610.36,4284.25 5703.9,4284.25 5910,4284.25 5920,4284.25 5924.74,4284.25 5990.06,4284.25 5992.19,4286.37 ; v1@5999.85,4281.83 ccw(c5992.19,4277.65) 5992.19,4286.37 ; v1@5999.85,4290.92 cw(c5992.19,4295.1) 5992.19,4286.37 ; v1(6008.19,4286.37) 5992.19,4286.37 ; v1(6482.52,4341.71) 6526.71,4341.71 6535,4350 6570,4350 6579.21,4340.79 U14.21@6619.41,4340.79 ; v1@6486.41,4337.82 cw(c6495.8,4328.43) 6495.8,4341.71 cw(c6495.8,4354.99) v1@6486.41,4345.6 ; v1@6489.24,4334.99 cw(c6505.46,4318.77) 6505.46,4341.71 cw(c6505.46,4364.64) v1@6489.24,4348.43 ; U14.21@6596.19,4335.13 ccw(c6582.54,4321.47) 6582.54,4340.79 ccw(c6582.54,4360.1) U14.21@6596.19,4346.44
DB_SRAM1.A9: U8.N9 U14.22 | length 6640.4
  Top Layer w4: v1(4231.86,4358.37) 4256.86,4383.37 4256.86,4821.86 4280,4845 4280,4923.18 4286.4,4929.58 4298.52,4941.71 4298.52,4991.71 v1(4398.52,5091.71) ; v1@4231.86,4363.87 ccw(c4231.86,4377.15) 4241.25,4367.76 ccw(c4250.64,4358.37) v1@4237.36,4358.37 ; v1@4231.86,4367.87 ccw(c4231.86,4390.81) 4248.07,4374.59 ccw(c4264.29,4358.37) v1@4241.36,4358.37 ; v1@4389.02,5091.71 cw(c4366.09,5091.71) 4382.31,5075.49 cw(c4398.52,5059.27) v1@4398.52,5082.21 ; v1@4393.02,5091.71 cw(c4379.75,5091.71) 4389.14,5082.32 cw(c4398.52,5072.93) v1@4398.52,5086.21 ; v3(5193.15,4229.37) U8.N9@5212.83,4209.69 ; U8.N9@5205.33,4209.69 ccw(c5187.23,4209.69) 5200.03,4222.49 ccw(c5212.83,4235.29) U8.N9@5212.83,4217.19 ; U8.N9@5205.49,4209.69 ccw(c5187.77,4209.69) 5200.3,4222.22 ccw(c5212.83,4234.75) U8.N9@5212.83,4217.03 ; 5205.95,4216.57 ccw(c5193.15,4203.76) 5193.15,4221.87 cw(c5193.15,4203.76) 5205.95,4216.57 ; 5205.95,4216.57 cw(c5218.76,4229.37) 5200.65,4229.37 ccw(c5218.76,4229.37) 5205.95,4216.57
  MidLayer2 w4: v1@4398.52,5082.21 cw(c4398.52,5059.27) 4414.74,5075.49 cw(c4430.96,5091.71) v1@4408.02,5091.71 ; v1@4398.52,5086.21 cw(c4398.52,5072.93) 4407.91,5082.32 cw(c4417.3,5091.71) v1@4404.02,5091.71 ; v1(4398.52,5091.71) 4423.52,5066.71 4552.19,5066.71 4706.86,5221.37 4706.86,5235 4776.86,5305 5025,5305 5060,5340 5320,5340 5365.37,5385.37 5819.63,5385.37 5850,5355 5923.87,5355 6046.5,5232.37 6594.65,5232.37 6662.02,5165 6662.02,4930.77 6668.42,4924.37 6705.63,4924.37 6716.25,4935 6742.29,4935 6750.04,4927.25 6796.42,4880.87 6806.09,4880.87 6841.75,4845.21 6955.02,4845.21 v1(6974.19,4826.04) ; v1@6964.69,4826.04 ccw(c6941.76,4826.04) 6957.97,4842.26 ccw(c6974.19,4858.48) v1@6974.19,4835.54 ; v1@6968.69,4826.04 ccw(c6955.41,4826.04) 6964.8,4835.43 ccw(c6974.19,4844.82) v1@6974.19,4831.54
  Bottom Layer w4: v1@4231.86,4348.87 cw(c4231.86,4325.94) 4248.07,4342.16 cw(c4264.29,4358.37) v1@4241.36,4358.37 ; v1@4231.86,4352.87 cw(c4231.86,4339.6) 4241.25,4348.99 cw(c4250.64,4358.37) v1@4237.36,4358.37 ; v1(4231.86,4358.37) 4290.19,4300.04 4523.19,4300.04 4580.19,4243.04 4715.86,4243.04 4731.86,4227.04 4731.86,4183.37 4748.52,4166.71 4756.86,4166.71 4772.04,4151.52 4804.3,4151.52 4807.81,4155.03 4807.81,4185.06 4824.02,4201.27 4824.02,4241.22 4827.68,4244.88 4860,4244.88 4870,4244.88 5076.1,4244.88 5169.64,4244.88 cw(c5169.64,4230.83) 5179.57,4240.76 ; v3@5185.68,4228.72 ccw(c5167.64,4227.14) 5179.28,4241.01 ccw(c5190.92,4254.88) v3@5192.5,4236.84 ; U14.22@6619.41,4309.29 6626.99,4301.71 6641.99,4301.71 6641.99,4286.71 6677.99,4250.71 6911.19,4250.71 6943.52,4283.04 6943.52,4308.37 6969.61,4334.46 7020.63,4334.46 7073.52,4387.36 7073.52,4635.04 6974.19,4734.37 v1(6974.19,4826.04) ; U14.22@6632.82,4302.45 cw(c6622.93,4286.16) 6641.99,4286.16 ; U14.22@6634.89,4305.87 cw(c6627.24,4293.26) 6641.99,4293.26 ; U14.22@6636.97,4309.29 cw(c6631.55,4300.37) U14.22@6641.99,4300.37 ; v1@6967.47,4819.32 cw(c6951.26,4803.11) 6974.19,4803.11 cw(c6997.13,4803.11) v1@6980.91,4819.32 ; v1@6970.3,4822.15 cw(c6960.91,4812.76) 6974.19,4812.76 cw(c6987.47,4812.76) v1@6978.08,4822.15
DB_SRAM1.A10: U8.M20 U14.23 | length 866.9
  Top Layer w4: U8.M20@5645.91,4249.06 v3(5665.59,4268.74) ; U8.M20@5645.91,4256.4 ccw(c5645.91,4274.12) 5658.44,4261.59 ccw(c5670.97,4249.06) U8.M20@5653.25,4249.06 ; U8.M20@5645.91,4256.56 ccw(c5645.91,4274.66) 5658.71,4261.86 ccw(c5671.51,4249.06) U8.M20@5653.41,4249.06 ; 5652.79,4255.94 cw(c5665.59,4243.13) 5665.59,4261.24 ccw(c5665.59,4243.13) 5652.79,4255.94 ; 5652.79,4255.94 ccw(c5639.98,4268.74) 5658.09,4268.74 cw(c5639.98,4268.74) 5652.79,4255.94
  MidLayer2 w4: v3@5666.24,4276.21 ccw(c5667.82,4294.25) 5679.46,4280.38 ccw(c5691.1,4266.51) v3@5673.06,4268.09 ; 5679.17,4280.13 cw(c5689.1,4270.2) 5689.1,4284.25 5782.64,4284.25 5910,4284.25 5920,4284.25 5924.74,4284.25 5966.06,4284.25 5986.19,4304.37 6012.51,4304.37 6024.84,4316.71 6135,4316.71 6143.33,4308.37 v1(6217.19,4308.37) ; v1@6210.47,4301.66 ccw(c6194.26,4285.44) 6194.26,4308.37 ccw(c6194.26,4331.31) v1@6210.47,4315.09 ; v1@6213.3,4304.49 ccw(c6203.91,4295.1) 6203.91,4308.37 ccw(c6203.91,4321.65) v1@6213.3,4312.26
  Bottom Layer w4: U14.23@6170.59,4309.29 6202.11,4309.29 ; U14.23@6195.05,4305.25 cw(c6202.11,4301.12) 6202.11,4309.29 ; U14.23@6195.05,4313.33 ccw(c6202.11,4317.46) 6202.11,4309.29 ; v1@6208.85,4303.83 ccw(c6201.19,4299.65) 6201.19,4308.37 ; v1@6208.85,4312.92 cw(c6201.19,4317.1) 6201.19,4308.37 ; v1(6217.19,4308.37) 6201.19,4308.37 ; 6201.19,4308.37 6202.11,4309.29
DB_SRAM1.A11: U8.L18 U14.24 | length 778.2
  Top Layer w4: U8.L18@5567.17,4288.43 v3(5586.85,4308.11) ; U8.L18@5567.17,4295.77 ccw(c5567.17,4313.49) 5579.7,4300.96 ccw(c5592.23,4288.43) U8.L18@5574.51,4288.43 ; U8.L18@5567.17,4295.93 ccw(c5567.17,4314.03) 5579.97,4301.23 ccw(c5592.77,4288.43) U8.L18@5574.67,4288.43 ; 5574.05,4295.31 cw(c5586.85,4282.5) 5586.85,4300.61 ccw(c5586.85,4282.5) 5574.05,4295.31 ; 5574.05,4295.31 ccw(c5561.24,4308.11) 5579.35,4308.11 cw(c5561.24,4308.11) 5574.05,4295.31
  Bottom Layer w4: v3@5587.5,4315.58 ccw(c5589.08,4333.62) 5600.72,4319.75 ccw(c5612.36,4305.88) v3@5594.32,4307.46 ; 5600.43,4319.5 cw(c5610.36,4309.57) 5610.36,4323.62 5703.9,4323.62 5910,4323.62 5920,4323.62 6100.08,4323.62 6117.25,4340.79 U14.24@6170.59,4340.79 ; U14.24@6147.37,4335.13 ccw(c6133.72,4321.47) 6133.72,4340.79 ccw(c6133.72,4360.1) U14.24@6147.37,4346.44
DB_SRAM1.A12: U8.L17 U14.25 | length 817.4
  Top Layer w4: U8.L17@5527.8,4288.43 v3(5547.48,4308.11) ; U8.L17@5527.8,4295.77 ccw(c5527.8,4313.49) 5540.33,4300.96 ccw(c5552.86,4288.43) U8.L17@5535.14,4288.43 ; U8.L17@5527.8,4295.93 ccw(c5527.8,4314.03) 5540.6,4301.23 ccw(c5553.4,4288.43) U8.L17@5535.3,4288.43 ; 5534.68,4295.31 cw(c5547.48,4282.5) 5547.48,4300.61 ccw(c5547.48,4282.5) 5534.68,4295.31 ; 5534.68,4295.31 ccw(c5521.87,4308.11) 5539.98,4308.11 cw(c5521.87,4308.11) 5534.68,4295.31
  Bottom Layer w4: v3@5548.13,4315.58 ccw(c5549.71,4333.62) 5561.35,4319.75 ; v3@5554.95,4307.46 cw(c5572.99,4305.88) 5561.35,4319.75 ; 6140.38,4375.04 ccw(c6140.38,4384.94) U14.25@6147.37,4377.94 ; U14.25@6145.16,4370.88 ccw(c6140.19,4370) 6140.19,4375.04 ; U14.25@6170.59,4372.28 6165.19,4372.28 6165.19,4375.04 6140.19,4375.04 ; 5561.35,4319.75 cw(c5590.86,4290.24) 5590.86,4331.97 5610.36,4331.97 5684.48,4331.97 5703.9,4331.97 5910,4331.97 5920,4331.97 6097.12,4331.97 6108.17,4343.02 6140.19,4375.04
DB_SRAM1.A13: U8.J23 U14.26 | length 781.7
  Top Layer w4: U8.J23@5764.02,4367.17 v3(5783.7,4386.85) ; U8.J23@5764.02,4374.51 ccw(c5764.02,4392.23) 5776.55,4379.7 ccw(c5789.08,4367.17) U8.J23@5771.36,4367.17 ; U8.J23@5764.02,4374.67 ccw(c5764.02,4392.77) 5776.82,4379.97 ccw(c5789.62,4367.17) U8.J23@5771.52,4367.17 ; 5770.9,4374.05 cw(c5783.7,4361.24) 5783.7,4379.35 ccw(c5783.7,4361.24) 5770.9,4374.05 ; 5770.9,4374.05 ccw(c5758.09,4386.85) 5776.2,4386.85 cw(c5758.09,4386.85) 5770.9,4374.05
  MidLayer1 w4: v3(5783.7,4386.85) 5861.38,4386.85 5910,4386.85 5920,4386.85 5965.14,4386.85 5975,4396.71 6047.52,4396.71 v1(6075.86,4425.04) ; v3@5788.89,4381.66 cw(c5801.43,4369.12) 5801.43,4386.85 cw(c5801.43,4404.58) v3@5788.89,4392.04 ; v3@5789,4381.55 cw(c5801.81,4368.74) 5801.81,4386.85 cw(c5801.81,4404.96) v3@5789,4392.15 ; v1@6066.36,4425.04 cw(c6043.42,4425.04) 6059.64,4408.82 cw(c6075.86,4392.61) v1@6075.86,4415.54 ; v1@6070.36,4425.04 cw(c6057.08,4425.04) 6066.47,4415.65 cw(c6075.86,4406.26) v1@6075.86,4419.54
  Bottom Layer w4: v1@6075.86,4415.54 cw(c6075.86,4392.61) 6092.07,4408.82 cw(c6108.29,4425.04) v1@6085.36,4425.04 ; v1@6075.86,4419.54 cw(c6075.86,4406.26) 6085.25,4415.65 cw(c6094.64,4425.04) v1@6081.36,4425.04 ; v1(6075.86,4425.04) 6100.86,4400.04 6170.59,4400.04 6173.52,4400.04 6173.52,4403.78 U14.26@6170.59,4403.78 ; 6124.69,4400.04 ccw(c6124.69,4432.12) U14.26@6147.37,4409.44 ; 6134.35,4400.04 ccw(c6134.35,4422.46) U14.26@6150.2,4406.61 ; 6142.74,4400.04 cw(c6142.74,4393.49) U14.26@6147.37,4398.12
DB_SRAM1.A14: U8.J19 U14.27 | length 853.2
  Top Layer w4: U8.J19@5606.54,4367.17 v3(5626.22,4386.85) ; U8.J19@5606.54,4374.51 ccw(c5606.54,4392.23) 5619.07,4379.7 ccw(c5631.6,4367.17) U8.J19@5613.88,4367.17 ; U8.J19@5606.54,4374.67 ccw(c5606.54,4392.77) 5619.34,4379.97 ccw(c5632.14,4367.17) U8.J19@5614.04,4367.17 ; 5613.42,4374.05 cw(c5626.22,4361.24) 5626.22,4379.35 ccw(c5626.22,4361.24) 5613.42,4374.05 ; 5613.42,4374.05 ccw(c5600.61,4386.85) 5618.72,4386.85 cw(c5600.61,4386.85) 5613.42,4374.05
  MidLayer2 w4: v3@5627.52,4394.24 ccw(c5630.67,4412.07) 5641.05,4397.24 ; v3@5633.61,4385.55 cw(c5651.44,4382.4) 5641.05,4397.24 ; v1@6109.19,4442.68 cw(c6098.89,4430.04) 6115.19,4430.04 ; v1@6111.72,4445.78 cw(c6105.75,4438.46) 6115.19,4438.46 cw(c6124.63,4438.46) v1@6118.67,4445.78 ; v1(6115.19,4450.04) 6115.19,4430.04 ; v1@6121.19,4442.68 ccw(c6131.49,4430.04) 6115.19,4430.04 ; 5641.05,4397.24 5649.63,4404.32 cw(c5665.85,4386.94) 5665.85,4410.71 5689.1,4410.71 5763.22,4410.71 5782.64,4410.71 5910,4410.71 5920,4410.71 5935.71,4410.71 5939,4414 5939,4430.71 5950,4441.71 5995.52,4441.71 6020.52,4416.71 6046.15,4416.71 6057.48,4405.37 6090.52,4405.37 6115.19,4430.04
  Bottom Layer w4: v1(6115.19,4450.04) 6129.96,4435.27 U14.27@6170.59,4435.27 ; U14.27@6147.37,4429.62 ccw(c6133.72,4415.96) 6133.72,4435.27 ccw(c6133.72,4454.59) U14.27@6147.37,4440.93
DB_SRAM1.A15: U8.B15 U14.42 | length 1420.9
  Top Layer w4: U8.B15@5449.06,4650.1 ccw(c5449.06,4667.83) 5461.59,4655.29 ; v1@5455.5,4935 cw(c5432.56,4935) 5448.78,4918.78 cw(c5465,4902.56) v1@5465,4925.5 ; U8.B15@5456.4,4642.76 cw(c5474.12,4642.76) 5461.59,4655.29 ; v1@5459.5,4935 cw(c5446.22,4935) 5455.61,4925.61 cw(c5465,4916.22) v1@5465,4929.5 ; v1(5465,4935) 5430.5,4900.5 5430.5,4840 5430.5,4813.04 5464.56,4778.98 5464.56,4770 5464.56,4763 5464.56,4724.74 5464.56,4720 5464.56,4710 5464.56,4662.47 cw(c5454.41,4662.47) 5461.59,4655.29
  Bottom Layer w4: v1(5465,4935) 5465,4934.85 5513.86,4983.71 5703,4983.71 5795,4891.71 5838.86,4891.71 5922.19,4808.37 5982.86,4808.37 6023.52,4849.04 6023.52,4899.37 6048.52,4924.37 6090,4924.37 6106.66,4907.72 U14.42@6170.59,4907.72 6136.7,4907.72 ; v1@5465,4940.5 ccw(c5465,4954.14) 5474.64,4944.49 ; v1@5465,4944.5 ccw(c5465,4967.8) 5481.47,4951.32 ; v1@5470.5,4935 cw(c5483.42,4935) 5474.28,4944.13 ; v1@5474.5,4935 cw(c5497.07,4935) 5481.11,4950.96 ; U14.42@6146.71,4902.81 ccw(c6136.7,4895.04) 6136.7,4907.72 ccw(c6136.7,4920.39) U14.42@6146.71,4912.62 ; U14.42@6147.37,4902.06 ccw(c6133.72,4888.4) 6133.72,4907.72 ccw(c6133.72,4927.03) U14.42@6147.37,4913.37